# EAGLE board 5CCE2EMP_Astable_Multivibrator_Board (EAGLE 9.7.0)
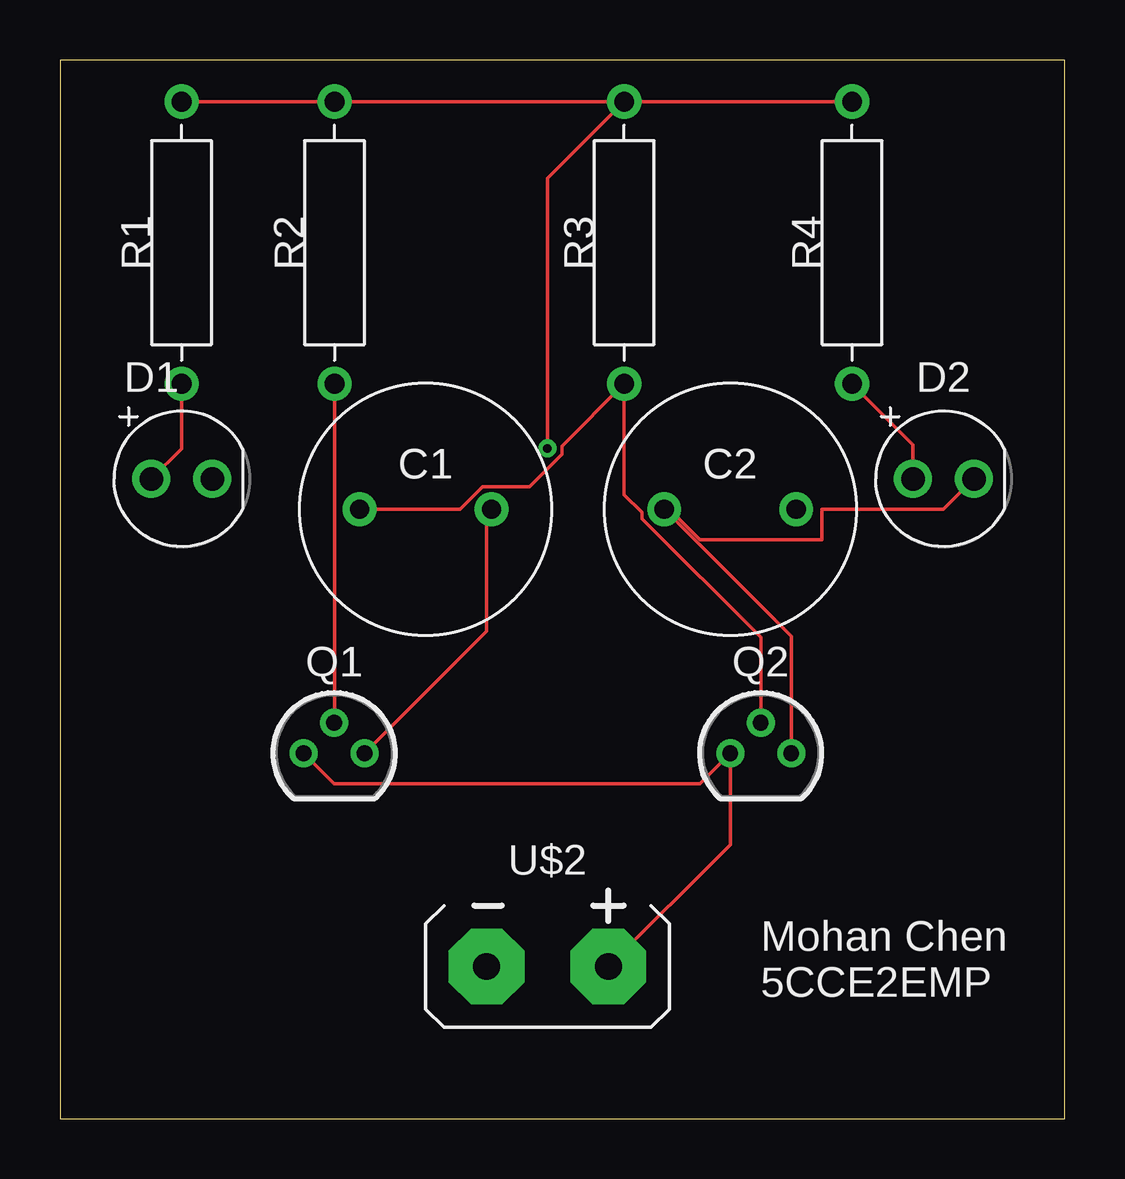
[diagram p0: board, top side]
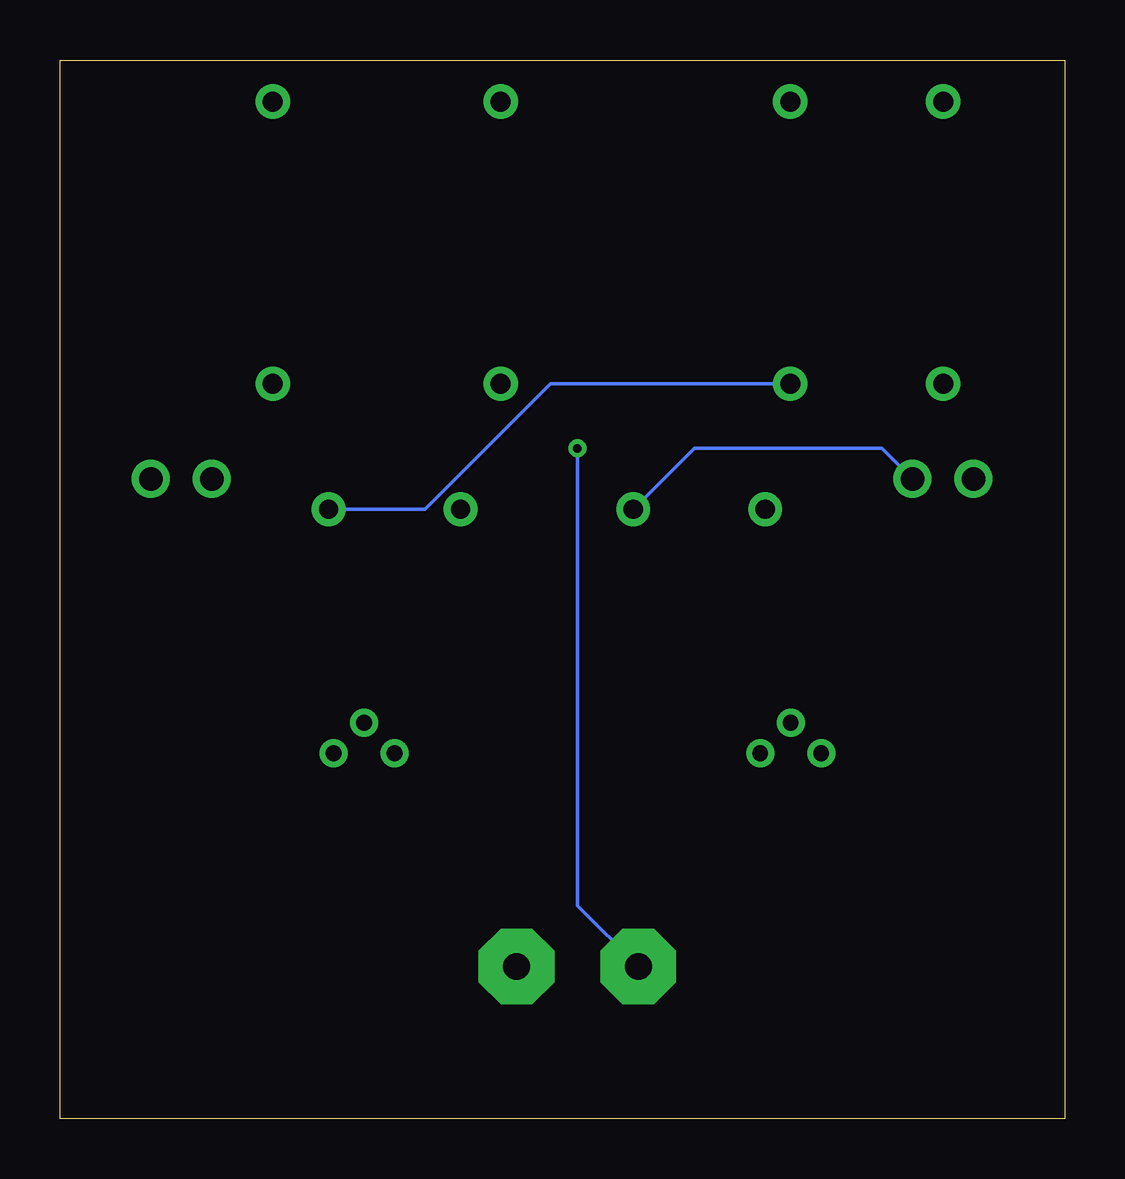
[diagram p1: board, bottom side, seen from below]

Size 41.89 x 44.12 mm. Coordinates in mm from the lower left corner, seen from the top.
Outline: 0,0 41.89,0 41.89,44.12 0,44.12 0,0
Copper layers (1*16): Top / Bottom
Stack-up Default Layer Stack: Top SilkScreen Epoxy Ink / Top SolderMask SR:Green 0.0254mm Dk 4.3 / Top Surface Finish Lead-Free 0.02mm / Top CuFoil:007 0.035mm / Dielectric-1 User Defined 1.5mm / Bottom CuFoil:007 0.035mm / Bottom Surface Finish Lead-Free 0.02mm / Bottom SolderMask SR:Green 0.0254mm Dk 4.3 / Bottom SilkScreen Epoxy Ink
Design rules: minimum drill size 0.35mm, minimum copper width 6mil, keepout clearance 0mil, drill distance 6mil, via restrict clearance 0mil, dimension clearance 40mil, restrict clearance 0mil, copper clearance wire_polygon to wire_polygon 6mil, copper clearance wire_polygon to pad_smd 6mil, copper clearance wire_polygon to via 6mil, copper clearance pad_smd to pad_smd 6mil, copper clearance pad_smd to via 6mil, copper clearance via to via 6mil, copper clearance smd to pad (same net) 6mil, copper clearance smd to via (same net) 6mil, copper clearance smd to smd (same net) 6mil

## Footprints (pad centres in the part's own frame; a part is rotated, then mirrored left to right if it is on the bottom)
CAPRD550W60D1025H1250B = drill 0.8 pad 1.4: 1 -2.75,0; 2 2.75,0
LEDRD254W60D565H860B = drill 0.981 pad 1.581: 1 -1.27,0; 2 1.27,0
TO92 = drill 0.66: 1 -1.27,0; 2 0,1.27; 3 1.27,0
RESAD1176W63L850D250B = drill 0.83 pad 1.43: 1 -5.88,0; 2 5.88,0
BATTERY-GENERIC = drill 1.118 pad 3.15 octagon: + 2.54,0; - -2.54,0

## Placement (x,y rotation side)
C1  5.1uF  [CAPRD550W60D1025H1250B]  15.24,25.4 0 top
C2  5.1uF  [CAPRD550W60D1025H1250B]  27.94,25.4 0 top
D1  LED_RED  [LEDRD254W60D565H860B]  5.08,26.67 0 top
D2  LED_RED  [LEDRD254W60D565H860B]  36.83,26.67 0 top
Q1  NPN_TO92-EBC  [TO92]  11.43,15.24 0 top
Q2  NPN_TO92-EBC  [TO92]  29.21,15.24 0 top
R1  1k  [RESAD1176W63L850D250B]  5.07,36.51 90 top
R2  47k  [RESAD1176W63L850D250B]  11.45,36.51 90 top
R3  47k  [RESAD1176W63L850D250B]  23.52,36.51 90 top
R4  1k  [RESAD1176W63L850D250B]  33.02,36.51 90 top
U$2  BATTERY-9VGENERIC  [BATTERY-GENERIC]  20.32,6.35 0 top

## Library data of the parts
C1 C2 = Tinkercad; CATEGORY: Capacitor
D1 D2 = Tinkercad; CATEGORY: Opto-Electronic; SUB-CATEGORY: LED
Q1 Q2 = Transistor; CATEGORY_L1: Transistor; CATEGORY_L2: BJT; CATEGORY_L3: NPN; DATASHEET: https://www.analog.com/media/en/package-pcb-resources/package/pkg_pdf/to-92t/T-3-1.pdf; DESCRIPTION: Generic NPN Transistor through Hole TO92-EBC Package; PACKAGE: Through Hole; PACKAGE_SIZE: TO92
R1-R4 = Tinkercad; CATEGORY: Resistor; SUB-CATEGORY: Fixed
U$2 = Tinkercad

## Nets
0: Q1.1 Q2.1 U$2.+
N$1: C1.2 D1.2 Q1.3
N$2: C2.1 D2.2 Q2.3
N$3: R1.2 R2.2 R3.2 R4.2 U$2.-
N$4: C2.2 Q1.2 R2.1
N$5: C1.1 Q2.2 R3.1
N$6: D1.1 R1.1
N$7: D2.1 R4.1

## Tracks (layer width: path | path; a pad name or v marks a point on that pad's centre or on a via)
0
  Top 0.152: U$2.+ 27.94,11.43 Q2.1 26.67,13.97 11.43,13.97 Q1.1
N$1
  Top 0.152: C1.2 17.78,25.19 17.78,20.32 Q1.3
  Bottom 0.152: C1.2 15.45,27.94 7.62,27.94 D1.2
N$2
  Top 0.152: D2.2 36.83,25.4 31.75,25.4 31.75,24.13 26.67,24.13 25.4,25.4 C2.1 30.48,20.11 Q2.3
N$3  (via drill 0.35)
  Top 0.152: R1.2 R2.2 R3.2 | R3.2 R4.2 | R3.2 20.32,39.19 v20.32,27.94
  Bottom 0.152: U$2.- 20.32,8.89 v20.32,27.94
N$4
  Top 0.152: R2.1 11.45,16.53 Q1.2
  Bottom 0.152: R2.1 21.44,30.63 26.67,25.4 C2.2
N$5
  Top 0.152: Q2.2 29.21,20.07 24.26,25.02 24.26,25.27 23.52,26.01 R3.1 20.93,28.04 20.93,27.69 19.57,26.33 17.61,26.33 16.68,25.4 C1.1
N$6
  Top 0.152: R1.1 5.07,27.93 D1.1
N$7
  Top 0.152: R4.1 35.56,28.09 D2.1

## Text on the board
SilkscreenTop: Mohan Chen / 5CCE2EMP